# Altium PCB PCB_Z35_Wireless_board.PcbDoc
Units mm, origin at the board's own origin, x right, y up, seen from the top; angles counter-clockwise.
Board outline 67.94 x 65.02 mm, 2 copper layers (Top Layer, Bottom Layer), stack 1.671 mm thick; 92 components, 183 nets, 301 pads, 107 vias.
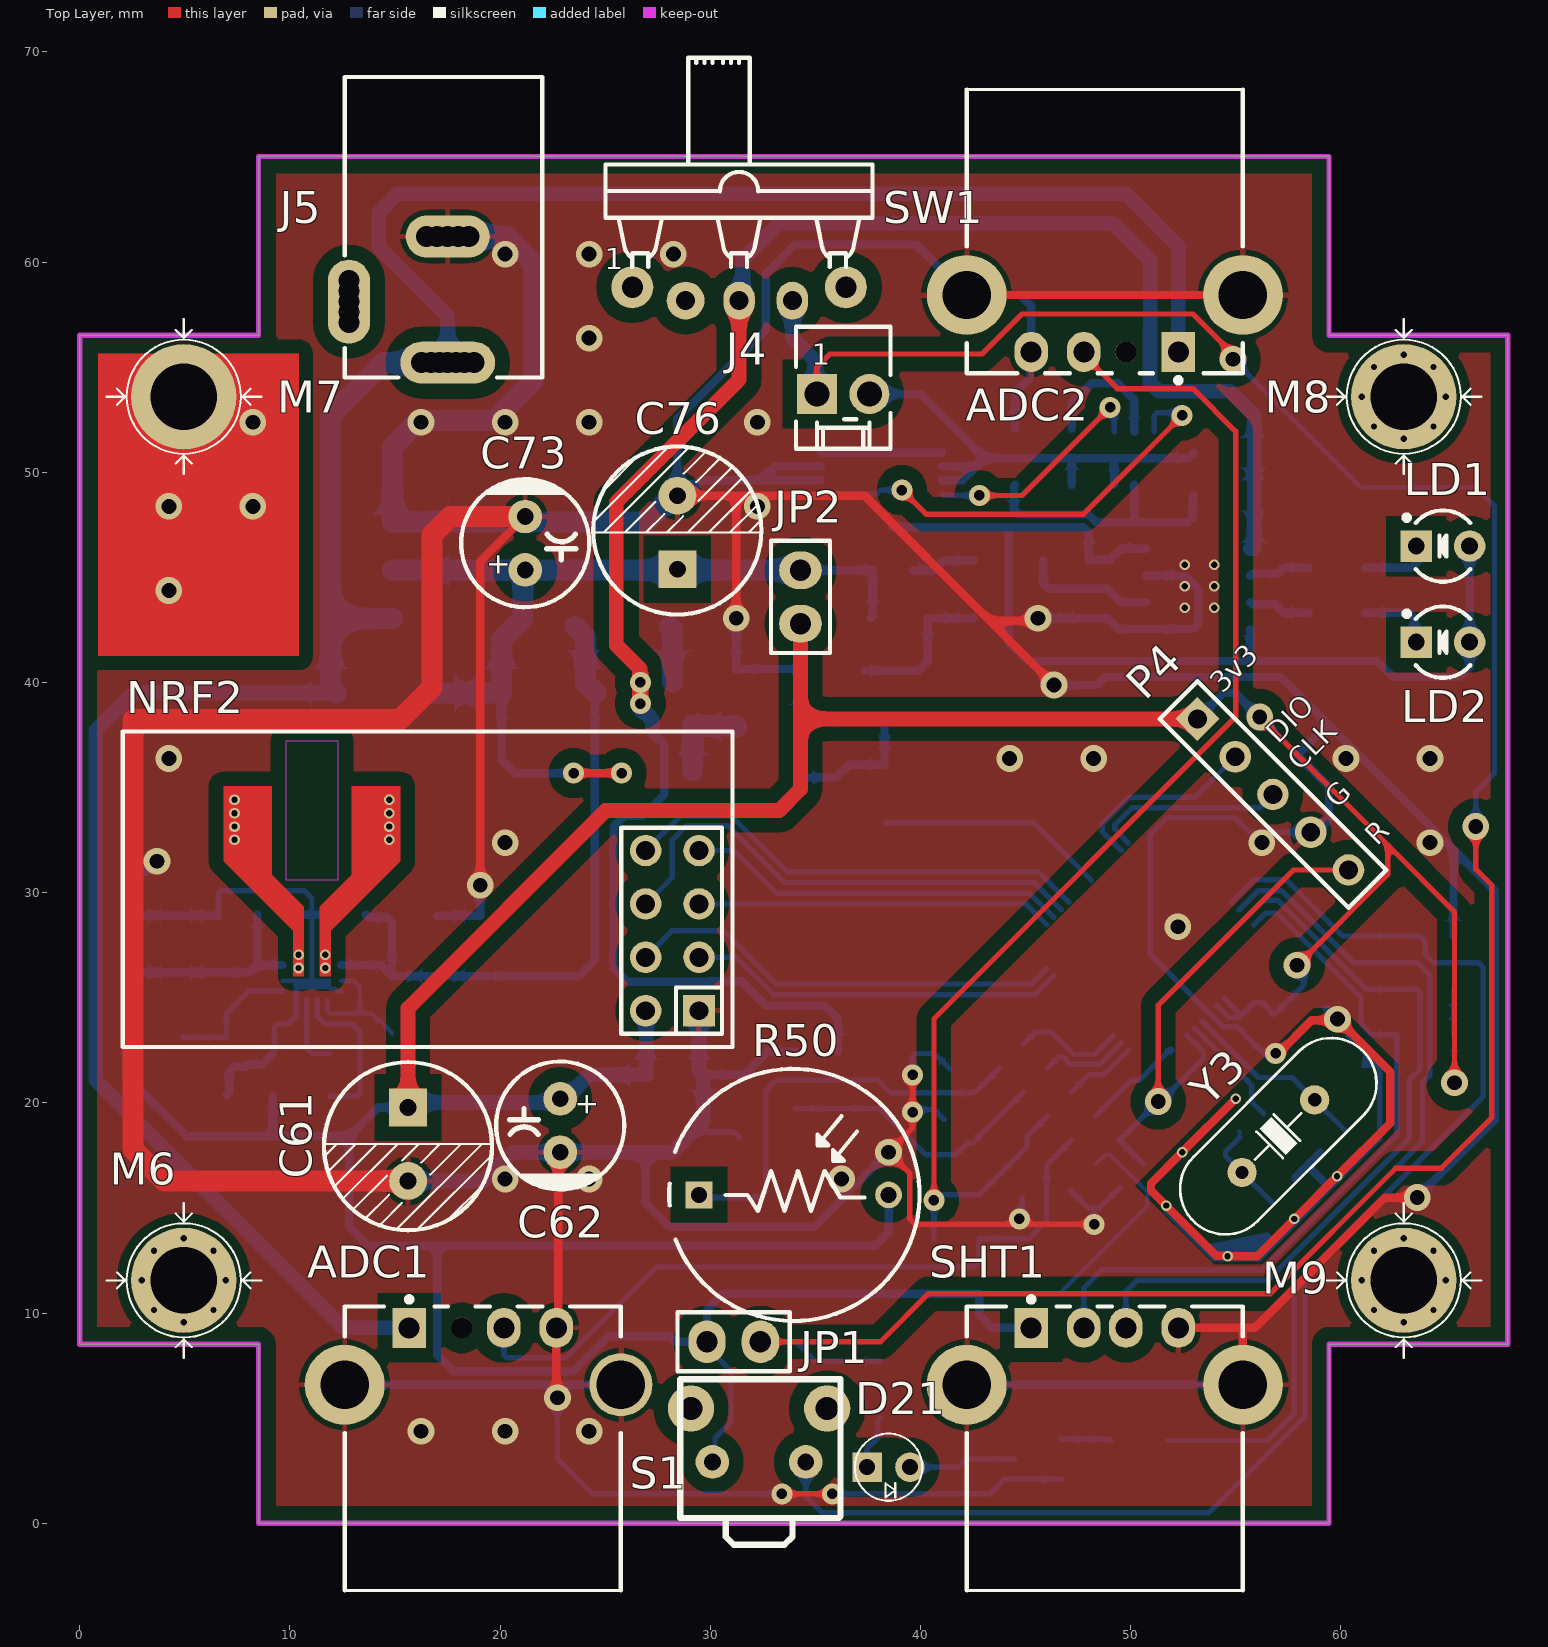
[diagram p0: Top Layer view]
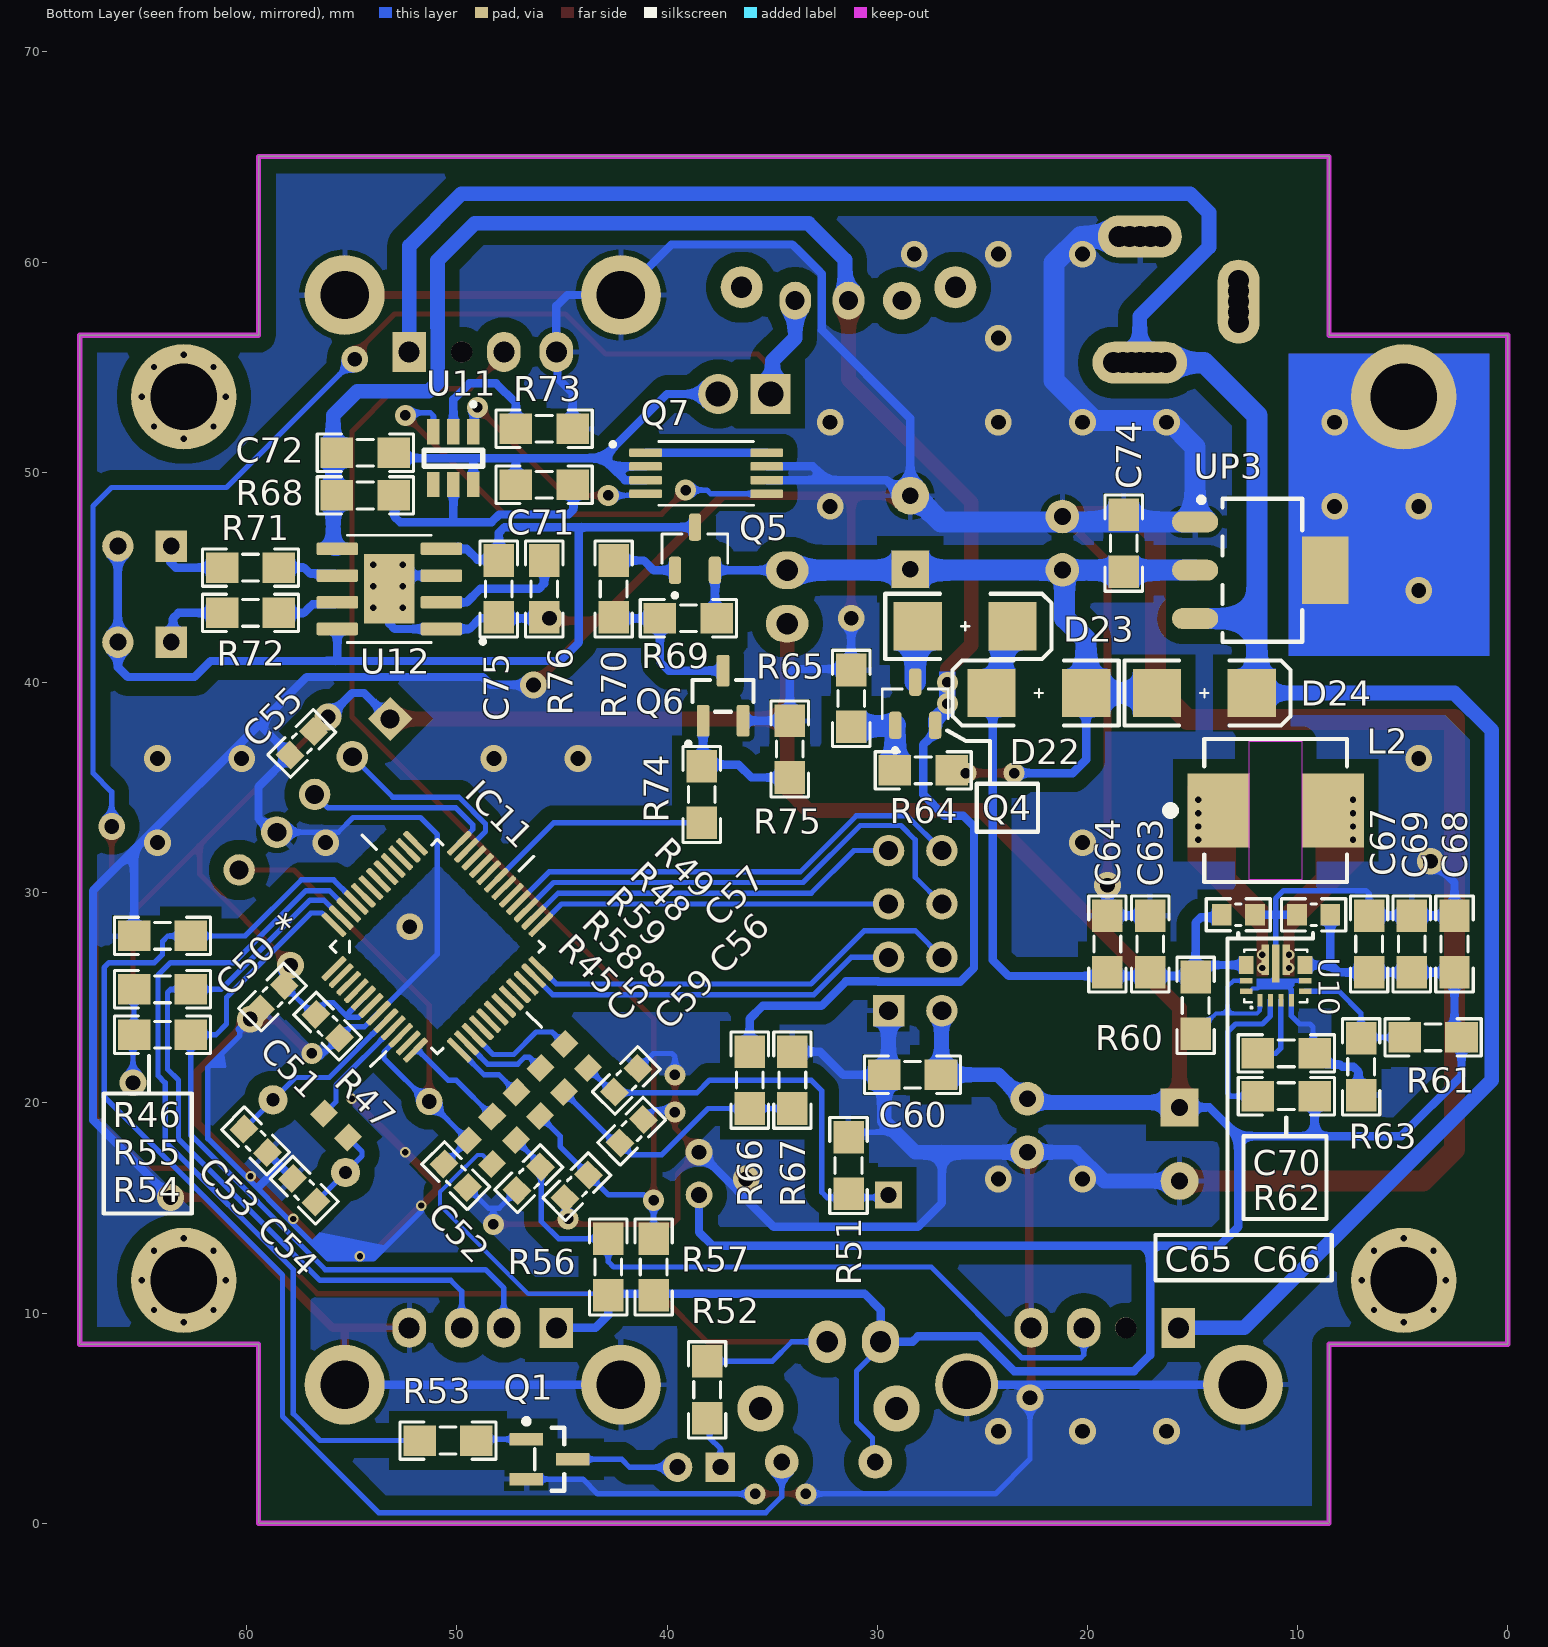
[diagram p1: Bottom Layer view, seen from below]
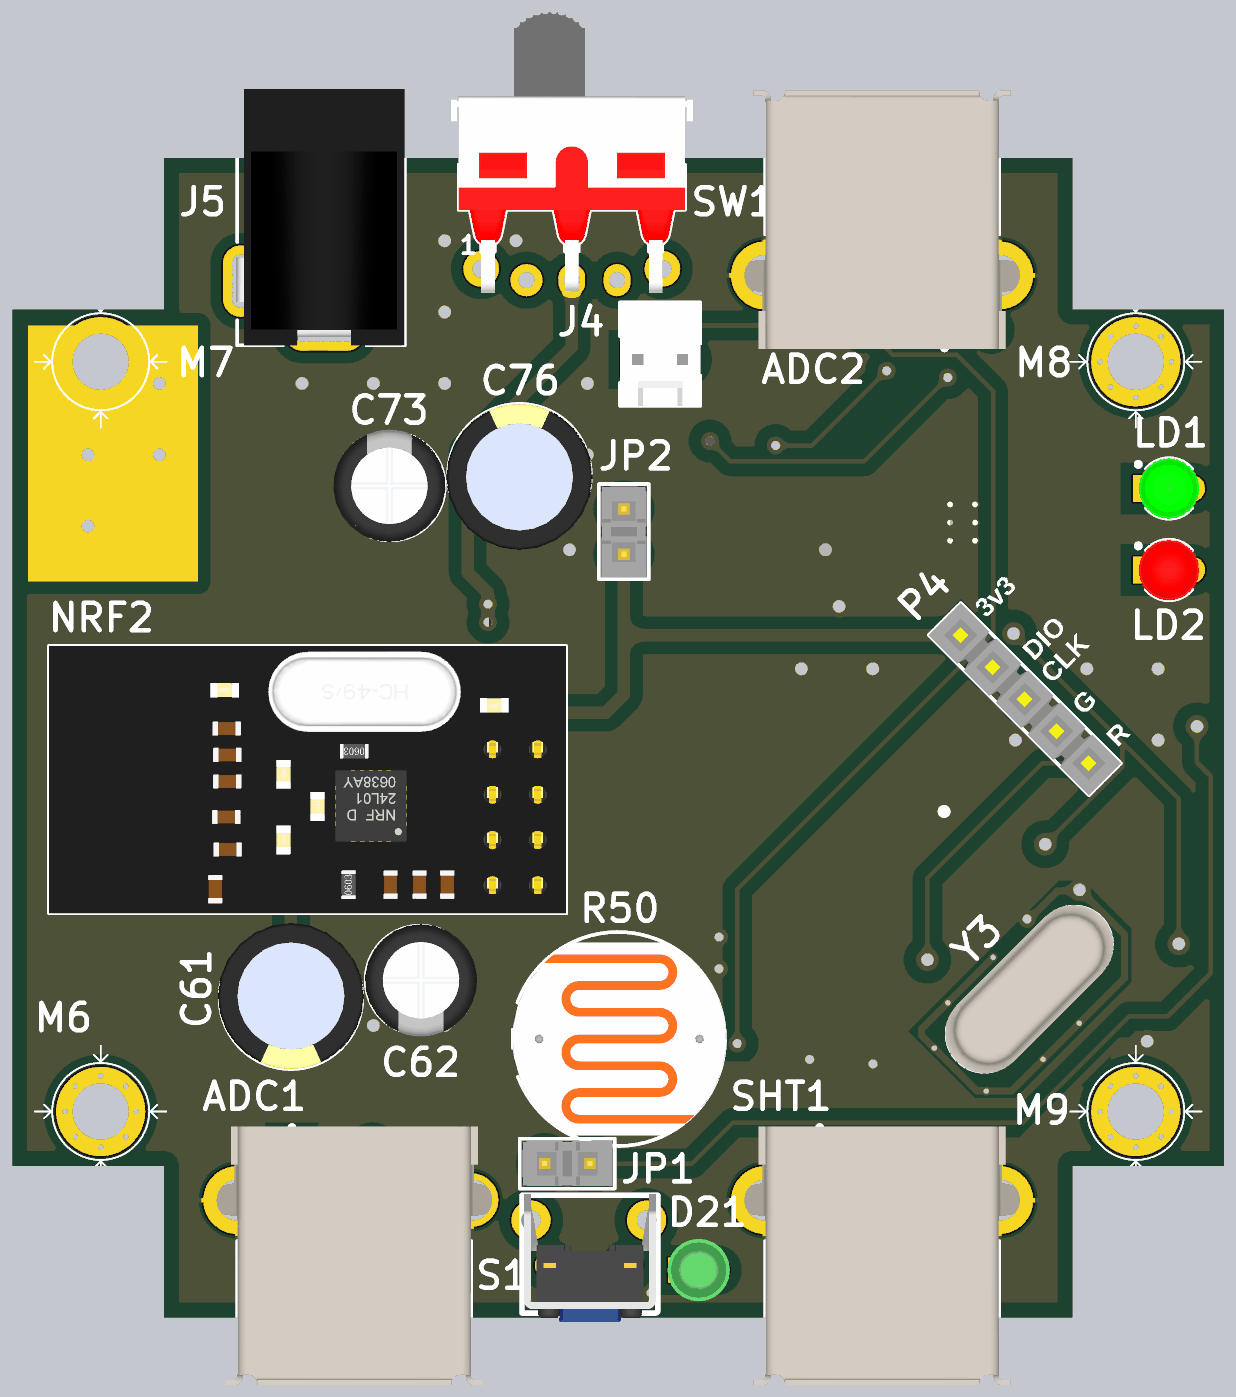
[diagram p2: 3D render of the assembled board from above, using the file's embedded part models]
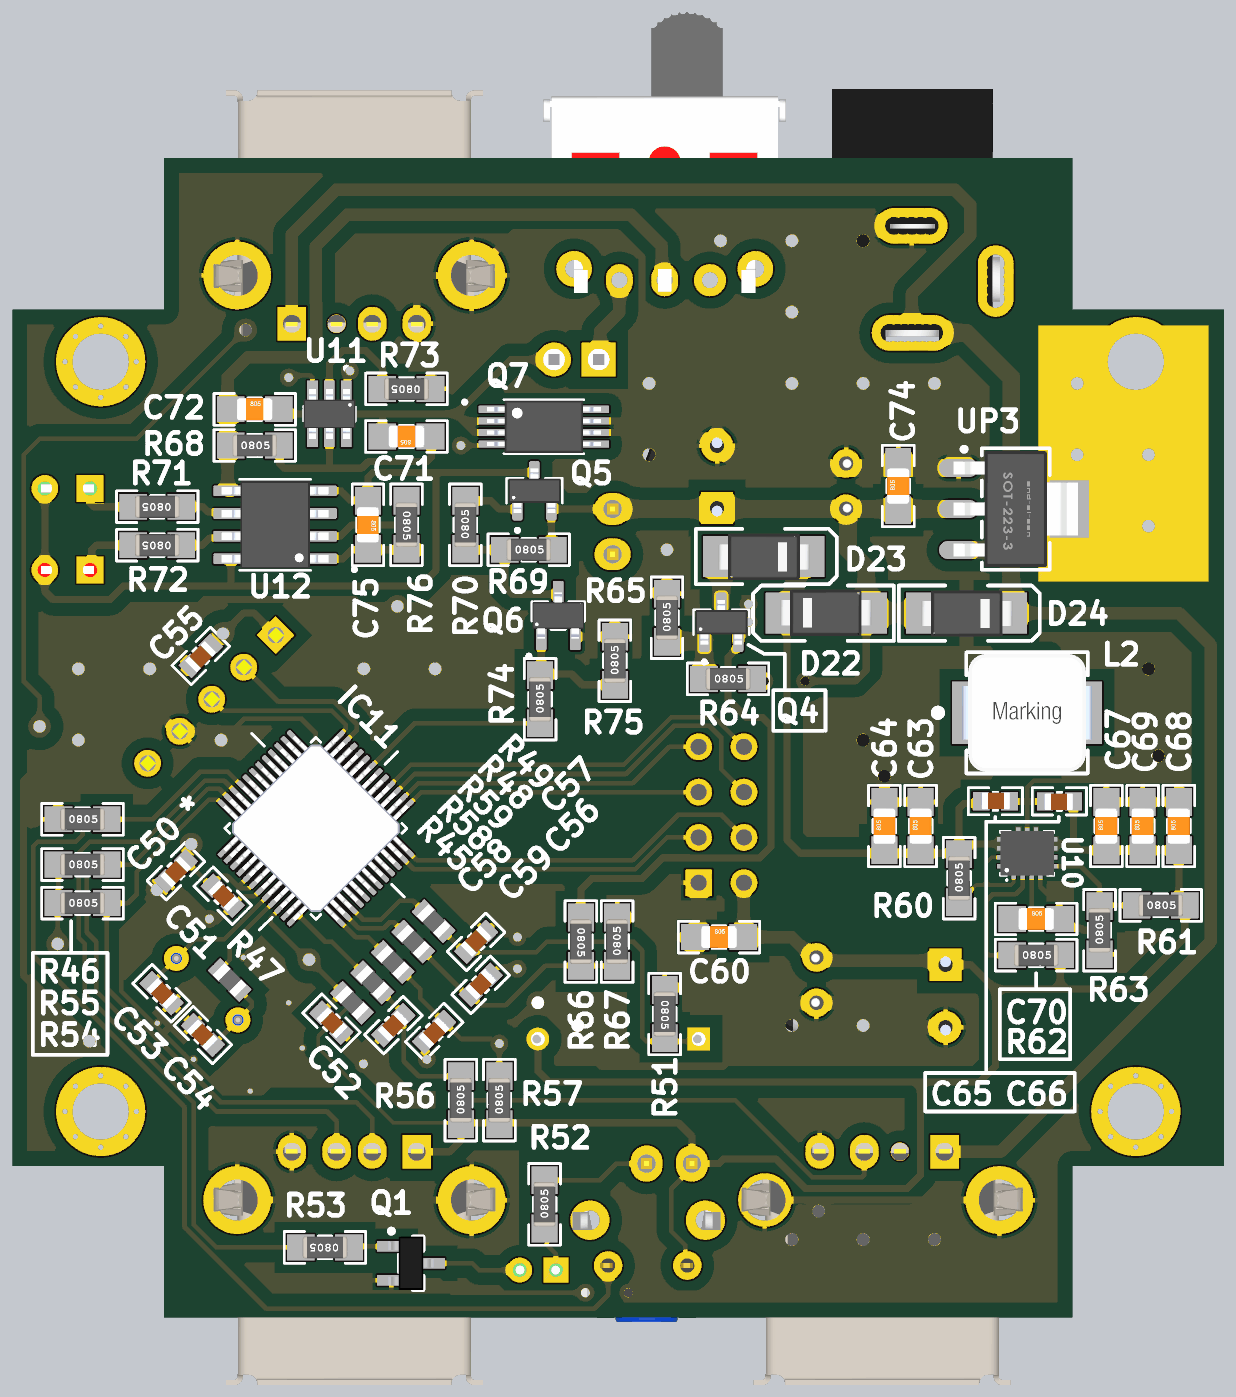
[diagram p3: 3D render of the assembled board from below, using the file's embedded part models]

## Layer stack, top to bottom
Top Solder: solder mask 0.0102, Solder Resist, Dk 3.5
Top Layer: signal copper 0.0356
Dielectric 1: dielectric 1.6, FR-4, Dk 4.8
Bottom Layer: signal copper 0.0356
Bottom Solder: solder mask 0.0102, Solder Resist, Dk 3.5

## Board outline
8.509,0 8.509,8.509 0,8.509 0,56.515 8.509,56.515 8.509,65.024 59.436,65.024 59.436,56.515 67.945,56.515 67.945,8.509 59.436,8.509 59.436,0

## Design rules (kind name [scope] priority, off if disabled: settings)
Clearance [All] p1: gap=0.15 ignorepadtopadclearanceinfootprint=FALSE except(0.7: Arc-Poly Track-Poly SMDPad-Poly THPad-Poly Via-Poly Fill-Poly Poly-Poly Poly-Region Poly-Text Poly-Hole)
ComponentClearance [All] p1: gap=0 collisioncheckmode=3 verticalgap=0 showdistances=FALSE
PlaneConnect [All] p1: pad.planeconnectstyle=Relief pad.reliefexpansion=0.508 pad.reliefentries=4 pad.reliefconductorwidth=0.254 pad.reliefairgap=0.254 via.planeconnectstyle=Direct via.reliefexpansion=0.508 via.reliefentries=4 via.reliefconductorwidth=0.254 via.reliefairgap=0
PolygonConnect [All] p1: thpad.connectstyle=Relief thpad.reliefconductorwidth=0.254 thpad.reliefentries=4 thpad.polygonreliefangle="90 Angle" thpad.airgapwidth=0.254 smdpad.connectstyle=Relief smdpad.reliefconductorwidth=0.254 smdpad.reliefentries=4 smdpad.polygonreliefangle="90 Angle" smdpad.airgapwidth=0.254 via.connectstyle=Direct via.reliefconductorwidth=0.254 via.reliefentries=4 via.polygonreliefangle="90 Angle" via.airgapwidth=0.254
RoutingVias [All] p1: holewidth=0.711 width=1.27 viastyle="Through Hole" minholewidth=0.3 minwidth=0.5 maxholewidth=0.711 maxwidth=1.27
SolderMaskExpansion [All] p1: expansion=0.102 istentingtop=FALSE
SupplyNets "Schematic Supply Nets_4" [InNet('GND')] p1: voltage=0.000
SupplyNets "Schematic Supply Nets_3" [InNet('3.3v')] p2: voltage=0.000
SupplyNets "Schematic Supply Nets_2" [InNet('+5')] p3: voltage=0.000
SupplyNets "Schematic Supply Nets_1" [InNet('GND-3.3v')] p4: voltage=0.000
SupplyNets "Schematic Supply Nets" [InNet('GND-12v')] p5: voltage=0.000
Width [All] p1: maxlimit=2 minlimit=0.2 preferedwidth=0.254
28 further rules are at their usual default settings.

## Components (designator, comment, footprint, x,y, rotation, side; value= is the part's Value field where it differs from the comment)
ADC1 "USB Connector" USB2.5-2H4C#1 19.177,3.81 r270 top
ADC2 "USB Connector" USB2.5-2H4C#2 48.768,61.214 r90 top
C50 "4.7uF" CAPC1608X90 58.801,25.019 r315 bottom
C51 "100nF" CAPC1608X90 56.134,23.622 r225 bottom
C52 "100nF" CAPC1608X90 50.038,16.51 r225 bottom
C53 "15pF" CAPC1608X90 59.563,18.161 r225 bottom
C54 "15pF" CAPC1608X90 57.277,15.875 r45 bottom
C55 "100nF" CAPC1608X90 57.404,37.084 r315 bottom
C56 "100nF" CAPC1608X90 41.656,18.669 r135 bottom
C57 "100nF" CAPC1608X90 41.91,21.082 r135 bottom
C58 "100nF" CAPC1608X90 46.609,16.383 r315 bottom
C59 "100nF" CAPC1608X90 44.323,16.002 r315 bottom
C60 "100nF" CAPC3413X12N 28.321,21.336 r180 bottom
C61 "1000uF" "Cap electrolitic radial 8x14-3.5" 15.621,18.034 r270 top value=1uF
C62 "10uF" "Cap electrolitic radial 6.3x12-2.5" 22.86,20.193 r270 top value=1uF
C63 "10uF" CAPC3413X12N 17.018,27.559 r90 bottom
C64 "10uF" CAPC3413X12N 19.05,27.559 r90 bottom
C65 "10uF" CAPC1608X90 12.796,28.938 r180 bottom
C66 "10uF" CAPC1608X90 9.271,28.956 r0 bottom
C67 "22uF" CAPC3413X12N 6.604,27.559 r90 bottom
C68 "22uF" CAPC3413X12N 2.54,27.559 r90 bottom
C69 "22uF" CAPC3413X12N 4.572,27.559 r90 bottom
C70 "10uF" CAPC3413X12N 10.541,22.352 r180 bottom
C71 "100nF" CAPC3413X12N 45.847,49.403 r0 bottom
C72 "10uF" CAPC3413X12N 54.356,50.927 r180 bottom
C73 "10uF" "Cap electrolitic radial 6.3x12-2.5" 21.195,45.355 r90 top value=1uF
C74 "100nF" CAPC3413X12N 18.274,46.625 r90 bottom
C75 "100nF" CAPC3413X12N 48.006,44.45 r270 bottom
C76 "1000uF" "Cap electrolitic radial 8x14-3.5" 28.434,47.133 r90 top value=1uF
D21 "LED3MM" LED3mm_GRN 38.481,2.667 r0 top
D22 "SS34" "DIODE SMD" 20.066,39.497 r0 bottom
D23 "SS34" "DIODE SMD" 28.067,42.672 r180 bottom
D24 "SMD 1N4007" "DIODE SMD" 16.692,39.497 r180 bottom
IC11 "STM32G030C8T6" QFP50P900X900X160-48N 50.927,27.432 r135 bottom
J4 "Battery" MOLEX_22-04-1021 36.322,53.721 r0 top
J5 "DC Power Jack" "DC Power Jack 1" 18.31,55.214 r270 top
JP1 "Jumper" "Jumper Small - 2.54 - GRAY" 31.115,8.636 r0 top
JP2 "Jumper" "Jumper Small - 2.54 - GRAY" 34.29,44.069 r270 top
L2 "1.5uH" WE-LHMI_7030 11.049,33.909 r180 bottom
LD1 "Green" LED_3MM_GREEN_1C-2A 64.854,46.49 r0 top
LD2 "Red" LED_3MM_RED_1C-2A 64.854,41.918 r0 top
M6 "Screw3mm" "Board Screw 3mm" 4.953,11.557 r0 top locked
M7 "Screw3mm" "Board Screw 3mm" 4.953,53.594 r0 top locked
M8 "Screw3mm" "Board Screw 3mm" 62.992,53.594 r0 top locked
M9 "Screw3mm" "Board Screw 3mm" 62.992,11.557 r0 top locked
NRF2 "NRF24L01+" NRF24L01P 29.464,24.384 r90 top
P4 "Prog" HDR1X5 53.177,38.263 r315 top
Q1 "BC337" SOT23_M 45.593,3.048 r180 bottom
Q4 "IRLML6402TRPBF" SOT95P237X112-3N 28.194,38.989 r90 bottom
Q5 "IRLML6402TRPBF" SOT95P237X112-3N 38.674,46.364 r90 bottom
Q6 "AO3400-5.8A" SOT95P260X140-3N 37.338,39.37 r90 bottom
Q7 "FS8205A" SOP65P640X120-8N 38.141,49.952 r180 bottom
R45 "10K" RESC1608X55N 48.895,17.653 r225 bottom value=100k
R46 "10K" RESC3413X04N 64.008,27.94 r180 bottom
R47 "1K2" RESC1608X55N 55.753,18.923 r45 bottom value=100k
R48 "1K" RESC1608X55N 45.466,21.082 r45 bottom value=100k
R49 "1K" RESC1608X55N 44.323,22.225 r45 bottom value=100k
R50 "02LDR1" LDR1_NTE 34.036,15.621 r0 top
R51 "10K" RESC3413X04N 31.369,17.018 r270 bottom
R52 "100R" RESC3413X04N 38.1,6.35 r90 bottom
R53 "1K" RESC3413X04N 50.419,3.937 r0 bottom
R54 "4K7" RESC3413X04N 64.008,23.241 r180 bottom
R55 "4K7" RESC3413X04N 64.008,25.4 r180 bottom
R56 "10K" RESC3413X04N 42.799,12.192 r90 bottom
R57 "10K" RESC3413X04N 40.64,12.192 r90 bottom
R58 "1K" RESC1608X55N 47.752,18.796 r45 bottom value=100k
R59 "1K" RESC1608X55N 46.609,19.939 r45 bottom value=100k
R60 "10K" RESC3413X04N 14.859,24.638 r90 bottom
R61 "470K" RESC3413X04N 3.556,23.114 r180 bottom
R62 "100K" RESC3413X04N 10.541,20.32 r180 bottom
R63 "150K" RESC3413X04N 6.985,21.717 r90 bottom
R64 "100R" RESC3413X04N 27.813,35.814 r180 bottom
R65 "10K" RESC3413X04N 31.242,39.243 r90 bottom
R66 "12K" RESC3413X04N 36.068,21.082 r270 bottom
R67 "33K" RESC3413X04N 34.036,21.082 r90 bottom
R68 "470R" RESC3413X04N 54.356,48.895 r180 bottom
R69 "10K" RESC3413X04N 38.989,43.053 r180 bottom
R70 "100R" RESC3413X04N 42.545,44.45 r90 bottom
R71 "1K" RESC3413X04N 59.817,45.466 r0 bottom
R72 "1K" RESC3413X04N 59.817,43.307 r0 bottom
R73 "1K" RESC3413X04N 45.847,52.07 r0 bottom
R74 "4K7" RESC3413X04N 38.354,34.671 r90 bottom
R75 "10K" RESC3413X04N 34.163,36.83 r90 bottom
R76 "1K5" RESC3413X04N 45.847,44.45 r270 bottom
S1 "switch" PCBComponent_1 36.322,6.985 r180 top
SHT1 "USB Connector" USB2.5-2H4C#3 48.768,3.81 r270 top
SW1 "SS-12F23" SW_C&K_110xM2S3AxE2 31.369,58.166 r270 top
U10 "TPS63070RNMT" QFN50P250X300X100-15N 11.049,26.035 r90 bottom
U11 "DW01A" SOT95P280X145-6N 50.165,50.673 r270 bottom
U12 "TP4056" SOP127P600X175-9N 53.213,44.45 r0 bottom
UP3 "5v - 3.3v" SOT223 11.684,45.339 r180 bottom
Y3 "8MHz" "CRYSTAL Small" 57.023,18.415 r225 top value="12 MHz"

## Footprints (in the part's own frame and the unit in brackets; to place one, negate y for a bottom-side part, rotate by r counter-clockwise, add the part's x,y. Pads: shape width x height; smd on the part's side, far side on the other; paste and mask are expansions set on the pad)
"Board Screw 3mm" [mm]
  round 5 hole 3.15 mask+0.1: S(0,0)
  silkscreen extent -3.68,-3.68 3.68,3.68
"Cap electrolitic radial 6.3x12-2.5" [mm] "Capacitor Electrolytic D=6.3 x H=12 - P=2.5 mm, Altium Compatible"
  round 1.6 hole 0.8: 1(0,0) 2(2.54,0)
  silkscreen extent -1.78,-3.04 4.32,3.05, body extent -1.87,-3.09 4.43,3.2, height 1.2
"Cap electrolitic radial 8x14-3.5" [mm] "Cap electrolitic radial 8x14-3.5-Design:Abbas Basereh"
  rect 1.8x1.8 hole 0.8: 1(-1.75,0)
  round 1.8 hole 0.8: 2(1.75,0)
  silkscreen extent -3.9,-4 4.1,4, body extent -4.1,-4.1 4.1,4.1, height 14.6
CAPC1608X90 [mm]
  rect 0.94x1.02 smd: 1(-0.821,0.01) 2(0.759,0.01)
  silkscreen extent -1.56,-0.75 1.49,0.77, body extent -0.8,-0.44 0.8,0.51, height 0.8
CAPC3413X12N [mm] "Chip Capacitor, 2-Leads, Body 3/40x1/30mm, IPC Medium Density-Design:Abbas Basereh"
  rect 1.55x1.45 smd: 1(-1.35,0) 2(1.35,0)
  silkscreen extent -2.29,-0.89 2.29,0.89, body extent -1,-0.63 1,0.62, height 0.78
"CRYSTAL Small" [mil] "DESIGNER ABBAS BASEREH"
  round 55 hole 25: 1(-96.06,0) 2(96.06,0)
  silkscreen extent -225,-85 225,85, body extent -226,-89 226,89, height 142
"DC Power Jack 1" [mm] "Power Adaptor Jack"
  round 1.5 hole 1: 1(0,0.45) 1(0,0) 1(0,-0.4) 1(0,-1.2) 1(0,-1.6) 1(0,-2.05) 2(-6,-1.8) 2(-6,0.2) 2(-6,-1.3) 2(-6,-0.3) 3(-3.9,-5.5) 3(-3.4,-5.5) 3(-2.4,-5.5) 3(-1.9,-5.5)
  oval 2x4.5 hole 1: 1(0,-0.8)
  oval 2x4 hole 1: 2(-6,-0.8)
  oval 4x2 hole 1: 3(-2.9,-5.5)
  silkscreen extent -13.59,-5.7 0.7,3.7, body extent -13.68,-5.74 0.72,3.66, height 11.05
"DIODE SMD" [mm]
  rect 2.3x2.3 smd: 1(0,0) 2(4.5,0)
  silkscreen extent -1.55,-1.55 6.35,1.55, body extent -0.28,-1.32 4.82,1.28, height 2.31
HDR1X5 [mm] "Connector; Header; 5 Position"
  rect 1.5x1.5 hole 0.9: 1(0,0)
  round 1.5 hole 0.9: 2(2.54,0) 3(5.08,0) 4(7.62,0) 5(10.16,0)
  silkscreen extent -1.27,-1.27 11.43,1.27, body extent -1.28,-1.27 11.42,1.27, height 8.38
"Jumper Small - 2.54 - GRAY" [mil]
  oval 70x80 hole 40: 1(-50,0) 2(50,0)
  silkscreen extent -105,-55 105,55, body extent -100,-50 100,50, height 337
LDR1_NTE [mil]
  rect 50x50 hole 30 paste-99999 mask+0: 1(-180,0)
  round 50 hole 30 paste-99999 mask+0: 2(175,0)
  silkscreen extent -236,-236 233,236, body extent -236,-213 236,213, height 394
LED3mm_GRN [mil]
  rect 55x55 hole 30: 1(-40,0)
  round 55 hole 30: 2(40,0)
  silkscreen extent -63,-63 63,63, body extent -69,-69 69,69, height 154
LED_3MM_GREEN_1C-2A [mm] "LED, Green, Body Dia. 3.43 mm, Pin spacing 2.54mm"
  rect 1.5x1.5 hole 0.8: 1(-1.27,0)
  round 1.5 hole 0.8: 2(1.27,0)
  silkscreen extent -1.85,-1.7 1.3,1.7, body extent -1.71,-1.71 1.72,1.72, height 9.85
LED_3MM_RED_1C-2A [mm] "LED, Red, Body Dia. 3.43 mm, Pin spacing 2.54mm"
  rect 1.5x1.5 hole 0.8: 1(-1.27,0)
  round 1.5 hole 0.8: 2(1.27,0)
  silkscreen extent -1.85,-1.7 1.3,1.7, body extent -1.71,-1.71 1.72,1.72, height 9.85
MOLEX_22-04-1021 [mm] "2.5mm (.100\") Pitch KK® Header, Single Row, Vertical, 2 Circuits"
  rect 1.9x1.9 hole 1.2: 1(-1.25,0)
  round 1.9 hole 1.2: 2(1.25,0)
  silkscreen extent -2.25,-2.6 2.25,3.2, body extent -2.25,-2.6 2.25,3.2, height 11.7
NRF24L01P [mm] "NRFL01+ Module"
  rect 1.5x1.5 hole 0.9: 1(0,0)
  round 1.5 hole 0.9: 2(0,2.54) 3(2.54,0) 4(2.54,2.54) 5(5.08,0) 6(5.08,2.54) 7(7.62,0) 8(7.62,2.54)
  silkscreen extent -1.72,-1.59 13.28,27.41, body extent -1.72,-1.59 13.28,27.41, height 15.5
PCBComponent_1 [mm]
  round 1.6 hole 0.8: 1(1.778,4.064) 2(6.223,4.064)
  round 2.2 hole 1.1: 3(7.239,1.524) 4(0.762,1.524)
  silkscreen extent 0.13,0.13 7.75,8, body extent -0.22,0.06 8.09,7.21, height 7.1
QFN50P250X300X100-15N [mm]
  rect 0.6x0.25 smd mask+0: 1(-1.15,0.75) 2(-1.15,0.25) 3(-1.15,-0.25) 4(-1.15,-0.75)
  rect 0.25x0.6 smd mask+0: 5(-0.725,-1.4) 6(-0.225,-1.4) 14(-0.225,1.4) 15(-0.725,1.4)
  rect 0.85x0.7 smd paste-1 mask+0: 7-8(0.525,-1.4) 12-13(0.525,1.4)
  rect 1.45x0.35 smd paste-2 mask+0: 9(0.775,-0.5)
  rect 1.8x0.35 smd paste-2 mask+0: 10(0.6,0)
  rect 1.45x0.35 smd paste-2 mask+0.102: 11(0.775,0.5)
  silkscreen extent -1.55,-1.5 1.25,1.5, body extent -1.25,-1.5 1.25,1.5, height 1
QFP50P900X900X160-48N [mil]
  rrect50% 58x11 smd: 1(-166,108) 2(-166,89) 3(-166,69) 4(-166,49) 5(-166,30) 6(-166,10) 7(-166,-10) 8(-166,-30) 9(-166,-49) 10(-166,-69) 11(-166,-89) 12(-166,-108) 25(166,-108) 26(166,-89) 27(166,-69) 28(166,-49) 29(166,-30) 30(166,-10) 31(166,10) 32(166,30) 33(166,49) 34(166,69) 35(166,89) 36(166,108)
  rrect50% 11x58 smd: 13(-108,-166) 14(-89,-166) 15(-69,-166) 16(-49,-166) 17(-30,-166) 18(-10,-166) 19(10,-166) 20(30,-166) 21(49,-166) 22(69,-166) 23(89,-166) 24(108,-166) 37(108,166) 38(89,166) 39(69,166) 40(49,166) 41(30,166) 42(10,166) 43(-10,166) 44(-30,166) 45(-49,166) 46(-69,166) 47(-89,166) 48(-108,166)
  silkscreen extent -247,-245 247,248, body extent -177,-177 177,177, height 60
RESC1608X55N [mm] "Chip Resistor, EIA 0603, Metric 1608, Body 1.6x0.8mm, IPC Medium Density"
  rect 0.9x1 smd: 1(-0.8,0) 2(0.8,0)
  body extent -0.87,-0.47 0.88,0.48, height 0.55
RESC3413X04N [mm] "Chip Resistor, 2-Leads, Body 3/40x1/30mm, IPC Medium Density-Design:Abbas Basereh"
  rect 1.55x1.45 smd: 1(-1.35,0) 2(1.35,0)
  silkscreen extent -2.29,-0.89 2.29,0.89, body extent -1.25,-0.62 1.25,0.62, height 0.79
SOP65P640X120-8N [mm]
  rrect25% 1.56x0.4 smd: 1(-2.88,0.975) 2(-2.88,0.325) 3(-2.88,-0.325) 4(-2.88,-0.975) 5(2.88,-0.975) 6(2.88,-0.325) 7(2.88,0.325) 8(2.88,0.975)
  silkscreen extent -4.54,-1.52 2.25,1.52, body extent -3.2,-1.47 3.2,1.47, height 1.2
SOP127P600X175-9N [mm]
  rrect25% 1.97x0.6 smd: 1(-2.475,1.905) 2(-2.475,0.635) 3(-2.475,-0.635) 4(-2.475,-1.905) 5(2.475,-1.905) 6(2.475,-0.635) 7(2.475,0.635) 8(2.475,1.905)
  rect 2.413x3.302 smd paste-3: 9(0,0)
  silkscreen extent -4.54,-2.55 2,2.6, body extent -3,-2.45 3,2.45, height 1.75
SOT23_M [mm] "SOT23, 3-Leads, Body 2.9x1.3mm, Pitch 0.95mm, Lead Span 2.3mm, IPC Low Density"
  rect 1.6x0.6 smd: 1(-1.1,0.95) 2(-1.1,-0.95) 3(1.1,0)
  silkscreen extent -1.23,-1.5 0.7,1.92, body extent -1.27,-1.5 1.27,1.5, height 1.1
SOT95P237X112-3N [mm]
  rrect50% 1.3x0.59 smd: 1(-1.025,0.95) 2(-1.025,-0.95) 3(1.025,0)
  silkscreen extent -2.32,-1.57 0.7,1.57, body extent -1.25,-1.46 1.25,1.46, height 1.12
SOT95P260X140-3N [mm]
  rrect25% 1.5x0.6 smd: 1(-1.19,0.95) 2(-1.19,-0.95) 3(1.19,0)
  silkscreen extent -2.39,-1.45 0.75,1.75, body extent -1.3,-1.45 1.3,1.45, height 1.4
SOT95P280X145-6N [mm]
  rect 1.21x0.59 smd: 1(-1.255,0.95) 2(-1.255,0) 3(-1.255,-0.95) 4(1.255,-0.95) 5(1.255,0) 6(1.255,0.95)
  silkscreen extent -2.65,-1.4 0.38,1.4, body extent -1.4,-1.45 1.4,1.45, height 1.45
SOT223 [mm] "SOT223, 4-Leads, Body 6.5x3.5mm, Pitch 2.30mm-Designer Abbas Basereh"
  oval 2.2x1 smd: 1(-3.2,2.3) 2(-3.2,0) 3(-3.2,-2.3)
  rect 2.2x3.2 smd: 4(3,0)
  Top Layer pour cut-out: -1.7,3.556 1.7,3.556 1.7,-3.556 -1.7,-3.556
  silkscreen extent -3.03,-3.4 1.9,3.47, body extent -3.5,-3.25 3.5,3.25, height 1.7
SW_C&K_110xM2S3AxE2 [mm] "Right Angled PC Thru-Hole SPDT Slide Switch, .200\" High Actuator, C&K 1000 Series"
  round 1.8 hole 0.9: 1(0,-2.54)
  oval 1.8x1.5 hole 0.9: 2(0,0) 3(0,2.54)
  round 2 hole 1: 4(-0.635,5.08) 4(-0.635,-5.08)
  silkscreen extent -6.48,-6.35 -1.61,6.35, body extent -15.06,-6.78 0.71,6.78, height 6.6
USB2.5-2H4C#1 [mm] "Connector; USB1.1, Type A, Thru-Hole; 4 Position; Right Angle DESIGNER ABBAS BASEREH"
  rect 1.9x1.6 hole 1: 1(-5.49,-3.5)
  round 1 hole 1: 2(-5.49,-1)
  oval 1.9x1.6 hole 1: 3(-5.49,1) 4(-5.49,3.5)
  round 3 hole 2.3: 4(-2.78,6.57)
  round 3.8 hole 2.3: 4(-2.78,-6.57)
  silkscreen extent -6.96,-6.57 7,6.57, body extent -6.9,-7.9 7.6,7.9, height 7.35
USB2.5-2H4C#2 [mm] "Connector; USB1.1, Type A, Thru-Hole; 4 Position; Right Angle DESIGNER ABBAS BASEREH"
  rect 1.9x1.6 hole 1: 1(-5.49,-3.5)
  round 1 hole 1: 2(-5.49,-1)
  oval 1.9x1.6 hole 1: 3(-5.49,1) 4(-5.49,3.5)
  round 3.8 hole 2.3: 4(-2.78,6.57) 4(-2.78,-6.57)
  silkscreen extent -6.96,-6.57 7,6.57, body extent -6.9,-7.9 7.6,7.9, height 7.35
USB2.5-2H4C#3 [mm] "Connector; USB1.1, Type A, Thru-Hole; 4 Position; Right Angle DESIGNER ABBAS BASEREH"
  rect 1.9x1.6 hole 1: 1(-5.49,-3.5)
  oval 1.9x1.6 hole 1: 2(-5.49,-1) 3(-5.49,1) 4(-5.49,3.5)
  round 3.8 hole 2.3: 4(-2.78,6.57) 4(-2.78,-6.57)
  silkscreen extent -6.96,-6.57 7,6.57, body extent -6.9,-7.9 7.6,7.9, height 7.35
WE-LHMI_7030 [mm]
  rect 2.95x3.5 smd paste+0 mask+0.102: 1(-2.725,0) 2(2.725,0)
  Keep-Out Layer region: 1.25,-3.3 -1.25,-3.3 -1.25,3.3 1.25,3.3
  silkscreen extent -5.2,-3.4 3.4,3.4, body extent -3.65,-3.3 3.65,3.3, height 2.7

## Part data
ADC1 ADC2 SHT1: library part "USB A-Type", "USB Connector-A Type"
C50 C51 C52 C53 C54 C55 C56 C57 C58 C59 C65 C66: library part "Cap 0603", "0603 C 100nF Ceramic Multilayer Capacitor, 25 V, +125degC, X7R Dielectric, +/-5%", Package="603-2 KEMET", Check_prices=https://www.snapeda.com/parts/C0603C104J3RACTU/KEMET/view-part/?ref=eda, MF=KEMET, MP=C0603C104J3RACTU, SnapEDA_Link=https://www.snapeda.com/parts/C0603C104J3RACTU/KEMET/view-part/?ref=snap
C60 C63 C64 C67 C68 C69 C70 C71 C72 C74 C75: library part "CAP SMD 0805", "CAP 0805", Data=16-12-2016, Desc.="CAP SMD 0805", Designer="Abbas Basereh"
C61 C62 C73 C76: library part "Cap ELECTROLITIC TOTAL SIZE", "Cap electrolitic radial", Data=16-12-2016, Designer="Abbas Basereh"
D21: library part "LED 3MM", "Light Emitting Diode", Designer="Ali Hafizi"
D22 D23 D24: library part "Diode SMD Package", "Diode SMD Pakage"
IC11: "ARMÂ® CortexÂ®-M0+ series Microcontroller IC 32-Bit Single-Core 64MHz 64KB (64K x 8) FLASH 48-LQFP (7x7)", Package="LQFP-48 STMicroelectronics", Availability="In Stock", Check_prices=https://www.snapeda.com/parts/STM32G030C8T6/STMicroelectronics/view-part/?ref=eda, MF=STMicroelectronics, MP=STM32G030C8T6, PRICE=None, Purchase-URL=https://pricing.snapeda.com/search/part/STM32G030C8T6/?ref=eda, SnapEDA_Link=https://www.snapeda.com/parts/STM32G030C8T6/STMicroelectronics/view-part/?ref=snap
J4: library part MOLEX_22-04-1021, "Connector 2 Male", Manufacturer=MOLEX, Manufacturer Part Number=22-04-1021, Author="CERN DEM JLC", Component Type=Standard, ComponentHeight=11.7mm, CreateDate=2/9/2012, Family=KK®, HelpURL=\\cern.ch\dfs\Applications\Altium\Datasheets\MOLEX_22-04-1021.pdf, LatestRevisionDate=2/9/2012, Mounted=Yes, Part Description="2.5mm (.100\") Pitch KK® Wire-to-Board Header, Vertical, with Friction Lock, 2 Circuits, Tin (Sn) Plating", Part Number=MOLEX_22-04-1021, Pin Count=2, PressFit=No, Sense=No, SMD=No, Socket=No, Status=Obsolete
J5: "DC Power Jack. Center Pin 2.5mm. Diameter: 5.7mm", Adding Date=10/21/2009, Company=Personal, Designer="Ali Hafizi", Project Name=Laser
L2: library part TMPC0603H-1R5MG-D, "SMD Power Choke Coil 1.5uH 18A 7.3x6.6mm", Package=None, Availability=Unavailable, MP=altium_native_batch, PRICE=None
LD1: library part LED_AVAGO_HLMP-1790, "LED Green 1C 2A", Manufacturer="AVAGO TECHNOLOGIES", Manufacturer Part Number=HLMP-1790, Author="CERN DEM JLC", Bonding=No, Color=Green, Component Type=Standard, ComponentHeight=6.35mm(min), CreateDate=6/12/2008, HelpURL=\\cern.ch\dfs\Applications\Altium\Datasheets\LED_AVAGO_HLMP-1790.pdf, LatestRevisionDate=3/17/2010, Mounted=Yes, PackageDescription="LED, Green, Body Dia. 3.43 mm, Pin spacing 2.54mm", Part Description="3mm Green LED", Part Number=LED_AVAGO_HLMP-1790, Pin Count=2, PressFit=No, Sense=No, SMD=No, Socket=No
LD2: library part LED_AVAGO_HLMP-1700, "LED Red 1C 2A", Manufacturer="AVAGO TECHNOLOGIES", Manufacturer Part Number=HLMP-1700, Author="CERN DEM JLC", Bonding=No, Color=Red, Component Type=Standard, ComponentHeight=6.35mm(min), CreateDate=6/12/2008, HelpURL=\\cern.ch\dfs\Applications\Altium\Datasheets\LED_AVAGO_HLMP-1700.pdf, LatestRevisionDate=3/17/2010, Mounted=Yes, PackageDescription="LED, Red, Body Dia. 3.43 mm, Pin spacing 2.54mm", Part Description="3mm Red LED", Part Number=LED_AVAGO_HLMP-1700, Pin Count=2, PressFit=No, Sense=No, SMD=No, Socket=No
M6 M7 M8 M9: library part "Board Screw 3mm", "Board Screw With Spacer 3mm", Data=16-12-2016, Designer="Abbas Basereh"
NRF2: library part NRF24L01P, "RF Module", Ali Hafizi=Creature
P4: library part "Header 5", "Header, 5-Pin", LatestRevisionDate=17-Jul-2002, LatestRevisionNote="Re-released for DXP Platform.", Publisher="Altium Limited"
Q1: "45 V, 500 mA NPN general-purpose transistors", ComponentLink1Description="Manufacturer Link", ComponentLink1URL=http://www.nxp.com/, ComponentLink2Description=Datasheet, ComponentLink2URL=http://www.nxp.com/, DatasheetVersion=2017, LatestRevisionDate=2017, LatestRevisionNote="IPC-7351 Footprint Added.", PackageDescription="3-Pin SOT-23 Package 0.95 mm Pitch, 2.3 mm Lead Span", PackageReference=SOT23, PackageVersion=2017-2-8, Published=2017-2-8, Publisher="Abbas Basereh"
Q4 Q5: "P-Channel 20 V 3.7A (Ta) 1.3W (Ta) Surface Mount Micro3Ã¢â€žÂ¢ /SOT-23", Package="SOT-23-3 ON Semiconductor", Check_prices=https://www.snapeda.com/parts/IRLML6402TRPBF/Infineon/view-part/?ref=eda, MF=Infineon, MP=IRLML6402TRPBF, SnapEDA_Link=https://www.snapeda.com/parts/IRLML6402TRPBF/Infineon/view-part/?ref=snap
Q6: "N-Channel 30 V 5.8A (Ta) 1.5W (Ta) Surface Mount SOT-23", Package=None, Availability="In Stock", Check_prices=https://www.snapeda.com/parts/AO3400-5.8A/MDD/view-part/?ref=eda, MF=MDD, MP=AO3400-5.8A, PRICE=None, Purchase-URL=https://pricing.snapeda.com/search/part/AO3400-5.8A/?ref=eda, SnapEDA_Link=https://www.snapeda.com/parts/AO3400-5.8A/MDD/view-part/?ref=snap
Q7: "Dual N-Channel Enhancement Mode Power MOSFET", Package=Package, Check_prices=https://www.snapeda.com/parts/FS8205A/Fortune+Semiconductor/view-part/?ref=eda, MF="Fortune Semiconductor", MP=FS8205A, SnapEDA_Link=https://www.snapeda.com/parts/FS8205A/Fortune+Semiconductor/view-part/?ref=snap
R45 R47 R48 R49 R58 R59: library part R0603_100K_0.1%_0.063W_10PPM, "Resistor - 0.1%", Case=0603, Manufacturer=GENERIC, Manufacturer1 ComponentHeight=0.55mm, Manufacturer1 Example="TYCO HOLSWORTHY", Manufacturer1 Part Number=RN73C1J100KBTDF, Power=0.063W, Tolerance=±0.1%, Author="CERN DEM JLC", Component Type=Standard, CreateDate=12/3/2007, HelpURL=\\cern.ch\dfs\Applications\Altium\Datasheets\R0603_Tyco_RN73.pdf, LatestRevisionDate=3/13/2008, Manufacturer Part Number=R0603_100K_0.1%_0.063W_10PPM, Mounted=Yes, Part Description="Thin Film Chip Resistor", Part Number=R0603_100K_0.1%_0.063W_10PPM, Pin Count=2, PressFit=No, Sense=No, SMD=Yes, Socket=No, Status="Not Recommended", TC=±10ppm
R46 R51 R52 R53 R54 R55 R56 R57 R60 R61 R62 R63 R64 R65 R66 R67 R68 R69 R70 R71 R72 R73 R74 R75 R76: library part "RES 0805 0.125W", "RES 0805", Data=16-12-2016, Desc.="RES SMD 0805", Designer="Abbas Basereh"
R50: library part "LDR 12mm", "12mm LDR / PIN to PIN is 9mm", Manufacturer_Name="NTE Electronics", Copyright="Copyright (C) 2025 Ultra Librarian. All rights reserved.", Manufacturer_Part_Number=02LDR1, RefDes=RefDes, Type=Type
S1: library part stand_key
SW1: library part SW_C&K_1103M2S3AQE2, "SPDT Switch", Manufacturer=C&K, Manufacturer Part Number=1103M2S3AQE2, Author="CERN DEM BC", Component Type=Standard, ComponentHeight=6.6mm, CreateDate=7/1/2019, Family=Switch, HelpURL=\\cern.ch\dfs\Applications\Altium\Datasheets\SW_C&K_1103M2S3AQE2.pdf, LatestRevisionDate=7/1/2019, Mounted=Yes, PackageDescription="Right Angle, PC Thru-Hole SPDT Slide Switch, .200\" High Actuator, C&K 1000 Series", Part Description="Right Angled PC Thru-Hole SPDT Slide Switch, .200\" High Actuator, C&K 1000 Series", Part Number=SW_C&K_1103M2S3AQE2, Pin Count=5, PressFit=No, Sense=Yes, Sense Comment=Non-washable, SMD=No, Socket=No, Status=None
U10: "TPS63070 2-V to 16-V Buck-Boost Converter With 3.6-A Switch Current", Package="VQFN-HR-15 Texas Instruments", Check_prices=https://www.snapeda.com/parts/TPS63070RNMT/Texas+Instruments/view-part/?ref=eda, MF="Texas Instruments", MP=TPS63070RNMT, SnapEDA_Link=https://www.snapeda.com/parts/TPS63070RNMT/Texas+Instruments/view-part/?ref=snap
U11: "One Cell Lithium-ion/Polymer Battery Protection IC", Package="SOT-23-6 Fortune Semiconductor", Check_prices=https://www.snapeda.com/parts/DW01A/Fortune+Semiconductor/view-part/?ref=eda, MF="Fortune Semiconductor", MP=DW01A, SnapEDA_Link=https://www.snapeda.com/parts/DW01A/Fortune+Semiconductor/view-part/?ref=snap
U12: "Complete single cell Li-Ion battery with a constant current / constant voltage linear charger", Package=Package, Availability="Not in stock", Check_prices=https://www.snapeda.com/parts/TP4056/NanJing+Top+Power+ASIC+Corp./view-part/?ref=eda, MF="NanJing Top Power ASIC Corp.", MP=TP4056, PRICE=None, SnapEDA_Link=https://www.snapeda.com/parts/TP4056/NanJing+Top+Power+ASIC+Corp./view-part/?ref=snap
UP3: library part AMS1117-x.x, "x.x Volt, 800mA Low-Dropout Linear Regulator, 4-pin SOT-223", Data=16-12-2016, Designer="Ali Hafizi"
Y3: library part XTAL, "XTAL Crystal", ComponentLink1Description=Datasheet, ComponentLink2Description=Reference, Design Date=2017-1-3, Designer="ABBAS BASEREH", Mounting Technology="Surface Mount\Through-Hole", Status=Unreleased
JP1 JP2: Company=E.P.I.L, Defualt State=Close, Design Date=2011/11/02

## Via types
v1: diameter 0.5, hole 0.3, Top Layer to Bottom Layer, tented both sides, 48 vias
v2: diameter 1.27, hole 0.711, Top Layer to Bottom Layer, tented both sides, 28 vias
v3: diameter 1, hole 0.5, Top Layer to Bottom Layer, tented both sides, 16 vias
v4: diameter 1.27, hole 0.7, Top Layer to Bottom Layer, tented both sides, 15 vias

## Nets (pads, with @x,y where several pads share a name; then routed paths per layer and width w, separated by ;. In a path a pad name is that pad's centre, name@x,y a point inside that pad or via, vN(x,y) a via of type N, cw(c..) or ccw(c..) an arc to the next point about the centre after c; other vN are vias at no path point)
3.3v: C50.1 C51.1 C55.1 C60.2 C61.1 C62.1 C66.1 C67.1 C68.1 C69.1 IC11.5 IC11.6 JP1.1 JP2.2 NRF2.2 P4.1 R45.2 R50.2 R54.1 R55.1 R56.1 R57.1 R61.2 R62.2 S1.2 SHT1.1 U10.7-8 | length 237.6
  Top Layer w0.254: v4(56.134,38.354) 62.23,32.258 ; v4(57.912,26.543) 62.23,30.861 62.23,32.258 ; v4(65.405,20.955) 65.405,29.083 62.23,32.258
  Top Layer w0.7: C61.1 15.621,24.511 25.019,33.909 33.274,33.909 34.29,34.925 34.29,38.263 ; JP2.2 34.29,38.263 ; P4.1 34.29,38.263
  Bottom Layer w0.2: R56.1@42.799,10.922 46.609,10.922 50.8,15.113 50.8,15.768 49.591,16.977 49.571,16.977 49.022,17.526 48.768,17.526 R45.2
  Bottom Layer w0.254: JP1.1 29.845,8.382 30.988,7.239 30.988,4.826 30.226,4.064 30.226,3.048 S1.2 ; IC11.6 54.106,24.63 54.657,24.079 55.194,24.079 55.323,24.208 ; IC11.5 55.229,24.208 55.323,24.208 ; v4(57.912,26.543) 58.039,26.543 58.213,26.369 58.213,26.134 58.241,26.106 58.241,25.621 C50.1 56.831,24.21 C51.1 56.707,24.319 56.261,24.765 55.88,24.765 55.323,24.208 ; R55.1 R54.1 65.405,23.194 v4(65.405,20.955)
  Bottom Layer w0.4: C66.1 8.45,26.611 8.399,26.56 ; R62.2 9.191,18.415 ; U10.7-8 8.399,26.56 ; C61.1 14.196,19.784 12.827,18.415 ; R50.2 38.481,13.843 37.846,13.208 17.018,13.208 ; R56.1 42.799,9.906 43.405,9.3 SHT1.1 ; R56.1@42.799,10.922 30.607,10.922 29.845,10.16 JP1.1 28.321,8.636 28.067,8.89 25.146,8.89 23.495,7.239 17.78,7.239 17.018,8.001 17.018,13.208 ; P4.1 54.411,39.497 54.976,39.497 C55.1 ; 8.399,26.56 8.048,26.209 C67.1 C69.1 C68.1 2.54,23.448 R61.2 2.206,21.289 5.08,18.415 9.191,18.415 ; 9.191,18.415 12.827,18.415 ; 12.827,18.415 12.827,14.097 13.716,13.208 17.018,13.208
  Bottom Layer w0.7: C61.1 15.858,20.021 22.688,20.021 C62.1 23.104,20.193 24.247,21.336 C60.2 26.948,21.36 26.948,24.36 NRF2.2
"3.3v / 12v": 
"3.3v Keys": 
"5v B1205": 
+5: C73.1 C74.1 C76.1 D22.1 D24.1 JP2.1 Q5.2 R64.2 R69.2 UP3.2 | length 44
  Top Layer w0.4: v3(23.495,35.687) v3(25.781,35.687)
  Bottom Layer w0.4: D22.1 20.066,36.322 20.701,35.687 v3(23.495,35.687) ; JP2.1 Q5.2 37.724,43.138 R69.2
  Bottom Layer w1: UP3.2 JP2.1 ; D24.1 D22.1 20.066,42.037 21.084,43.055 21.084,45.244 C73.1
+12v: ADC1.1 ADC2.1 D24.2 J5.1 UP3.3 | length 123.2
  Bottom Layer w0.7: D24.2 2.54,39.497 0.762,37.719 0.762,21.082 12.544,9.3 ADC1.1 ; J5.1@17.51,55.214 17.51,57.42 14.224,60.706 14.224,62.357 15.113,63.246 49.784,63.246 52.268,60.762 ADC2.1
  Bottom Layer w1: D24.2 11.938,39.751 11.938,43.039 ; UP3.3 11.938,43.039 ; J5.1@16.26,55.214 14.447,55.214 11.938,52.705 11.938,43.039
"+12v Adopter": 
+12v_Sun_LED: 
ADC1: IC11.12 R58.2 | length 5
  Bottom Layer w0.254: R58.2 50.038,21.082 50.419,21.082 51.899,22.562 51.917,22.562 IC11.12
ADC2: IC11.13 R59.2 | length 3.5
  Bottom Layer w0.254: R59.2 48.006,21.336 48.71,21.336 IC11.13
ADC3: C56.1 R48.1 R66.2 R67.1 | length 13
  Bottom Layer w0.254: R67.1 38.053,19.732 40.259,17.526 41.674,17.526 C56.1 42.48,18.096 R48.1
ADC4: IC11.15 R49.2 | length 5.4
  Bottom Layer w0.254: R49.2 45.466,23.368 46.228,23.368 47.295,22.301 48.275,22.301 IC11.15
Bat+: J4.1 JP1.2 R52.2 SW1.3 | length 118.5
  Top Layer w0.254: JP1.2 38.1,8.636 40.386,10.922 56.642,10.922 62.611,16.891 64.77,16.891 67.183,19.304 67.183,30.353 66.421,31.115 v4(66.421,33.147) ; J4.1 35.072,55.011 35.687,55.626 42.926,55.626 44.831,57.531 52.959,57.531 54.864,55.626 v4(54.864,55.372)
  Bottom Layer w0.254: JP1.2 34.069,8.636 35.005,7.7 R52.2 ; v4(54.864,55.372) 60.96,49.276 66.421,49.276 67.31,48.387 67.31,35.687 66.421,34.798 v4(66.421,33.147)
  Bottom Layer w0.7: SW1.3 33.909,56.388 34.986,55.311 34.986,53.807 J4.1
Bat-: C71.2 C72.2 J4.2 Q7.2 Q7.3 U11.6 | length 23.5
  Bottom Layer w0.4: J4.2 40.005,53.721 43.053,50.673 ; Q7.3 42.007,49.627 42.657,50.277 ; Q7.2 42.657,50.277 ; C71.2 47.197,50.626 47.244,50.673 ; U11.6 49.215,50.607 49.149,50.673 ; C72.2 52.752,50.673 49.149,50.673 ; 42.657,50.277 43.053,50.673 ; 43.053,50.673 47.244,50.673 ; 47.244,50.673 49.149,50.673
Blink: IC11.46 R53.2 | length 41.2
  Bottom Layer w0.254: R53.2 56.504,3.937 57.785,5.218 57.785,12.065 63.881,18.161 63.881,20.955 64.22,21.294 64.22,26.077 63.627,26.67 60.602,26.67 57.173,30.099 56.073,30.099 IC11.46
"CE - NRF": IC11.23 NRF2.3 | length 18
  Bottom Layer w0.254: NRF2.3 31.242,26.924 33.02,25.146 45.444,25.146 IC11.23
"Charge En": IC11.31 R74.1 | length 10.9
  Bottom Layer w0.254: R74.1 45.397,33.321 IC11.31
"CO2 IN 1": ADC1.3 C58.1 R56.2 R58.1 | length 34.9
  Bottom Layer w0.254: ADC1.3 20.177,8.017 20.326,7.868 23.108,7.868 27.432,12.192 42.545,12.192 42.799,12.446 R56.2 45.165,13.542 45.993,14.37 45.993,16.928 C58.1 46.021,17.065 R58.1
"CO2 IN 2": ADC2.3 C59.1 R57.2 R59.1 | length 60.6
  Top Layer w0.254: v3(40.64,15.367) 40.64,24.003 54.991,38.354 54.991,51.943 52.959,53.975 49.367,53.975 47.768,55.574 ADC2.3
  Bottom Layer w0.254: R57.2 40.64,15.113 v3@40.868,15.341 ; v3(40.64,15.367) 40.842,15.367 41.096,15.621 42.781,15.621 C59.1 45.085,17.925 45.085,18.415 R59.1
Cooler: 
"Cooler out": 
"CSN - NRF": IC11.24 NRF2.4 | length 21
  Bottom Layer w0.254: NRF2.4 28.194,28.194 30.618,28.194 33.158,25.654 45.27,25.654 IC11.24
"CSN - W25": 
D4: 
D5: 
D6: 
D7: 
"Day lamp": 
"Day lamp out": 
"Down button": 
"Down button K": 
E: 
"ESP 3.3v": 
fuse: 
"Gas heater": 
"Gas heater out": 
GND: ADC1.4 ADC2.4 C50.2 C51.2 C52.2 C53.2 C54.2 C55.2 C56.2 C57.2 C58.2 C59.2 C60.1 C61.2 C62.2 C63.2 C64.2 C65.2 C66.2 C67.2 C68.2 C69.2 C70.2 C73.2 C74.2 C75.2 C76.2 IC11.7 J5.2 NRF2.1 P4.4 Q1.2 Q6.2 Q7.6 Q7.7 R46.1 R51.1 R63.1 R65.2 R67.2 R73.1 R75.2 R76.2 SHT1.4 U10.4 U10.6 U10.10 U10.15 U12.1 U12.3 U12.9 UP3.1 | length 541.4
  Top Layer w0.254: v3(33.401,1.397) v3(35.814,1.397) ; v3(39.624,21.336) v3(39.624,19.558) 39.624,18.796 v4(38.481,17.653) 39.497,16.637 39.497,14.478 39.773,14.202 39.983,14.202 40.005,14.224 44.248,14.224 ; v3(44.704,14.478) 44.502,14.478 44.248,14.224 ; v3(48.26,14.224) 44.248,14.224
  Top Layer w0.4: 2.54,31.496 v4(3.683,31.496) ; v4(19.05,30.353) 19.05,45.75 C73.2 ; ADC1.4@22.677,9.3 22.677,6.406 22.733,6.35 v4(22.733,5.969) ; ADC1.4@22.769,9.391 C62.2@22.769,17.562 ; C76.2 31.242,48.883 ; v4(31.242,43.053) 31.242,48.883 ; ADC2.4@42.198,58.434 ADC2.4@55.338,58.434 ; v4(45.593,43.053) 45.466,42.926 43.307,42.926 ; v4(46.355,39.878) 43.307,42.926 ; SHT1.4@52.268,9.3 55.245,9.3 ; v1(54.991,20.193) v1(52.451,17.653) 50.966,16.168 50.966,15.836 v1(51.689,15.113) 54.083,12.719 54.591,12.719 v1(54.61,12.7) 56.007,12.7 v1(57.785,14.478) v1(59.817,16.51) 62.357,19.05 62.357,21.463 v4(59.835,23.985) 59.779,23.929 58.6,23.929 57.023,22.352 v3(56.896,22.352) ; SHT1.4@55.338,6.59 55.338,9.207 55.245,9.3 ; v4(63.627,15.494) 62.103,15.494 55.909,9.3 55.245,9.3 ; 31.242,48.883 37.35,48.883 43.307,42.926
  Top Layer w1: C61.2 4.036,16.284 2.54,17.78 2.54,31.496 2.54,38.227 15.24,38.227 16.764,39.751 16.764,47.006 17.653,47.895 C73.2
  Bottom Layer w0.2: U10.6 10.165,25.81 10.448,25.527 ; 11.049,25.654 11.176,25.781 11.557,25.781 11.903,25.435 12.149,25.435 12.274,25.31 U10.15
  Bottom Layer w0.254: C67.2 6.604,29.95 6.753,30.099 10.668,30.099 11.049,29.718 11.049,28.947 U10.10 11.049,25.654 10.922,25.527 10.448,25.527 10.299,25.378 U10.4 10.299,24.142 9.906,23.749 9.42,23.749 9.271,23.6 9.271,22.432 C70.2 ; v4@22.733,6.59 v4(22.733,5.969) 22.733,3.048 24.384,1.397 v3(33.401,1.397) ; 29.146,18.605 31.131,18.605 R51.1 ; v3(35.814,1.397) 43.307,1.397 44.008,2.098 Q1.2 ; v3(39.624,19.558) 39.751,19.685 40.64,19.685 41.112,19.213 C56.2 ; v3(39.624,21.336) 39.624,22.203 39.773,22.352 40.655,22.352 C57.2 ; v3(44.704,14.478) 44.824,14.598 44.824,15.43 C59.2 ; C58.2 47.991,14.986 48.26,14.986 ; v3(48.26,14.224) 48.26,14.986 ; C52.2 48.499,14.986 48.26,14.986 ; v1(51.689,15.113) 51.689,14.859 53.969,12.579 56.128,12.579 61.849,18.299 61.849,21.68 60.325,23.204 60.325,23.495 ; v3@57.08,22.225 56.458,22.225 C51.2 55.061,23.622 54.396,23.622 53.747,24.271 IC11.7 50.927,27.073 50.927,32.766 51.74,33.579 54.94,33.579 55.644,32.875 P4.4
  Bottom Layer w0.4: v4(3.683,31.496) 3.556,31.496 2.54,30.48 C68.2 C69.2 C67.2 ; R63.1 7.112,20.494 7.112,21.483 7.346,21.717 7.874,21.717 7.984,21.827 8.666,21.827 C70.2 ; C66.2 C66.2 11.049,28.947 12.036,28.947 C65.2 ; ADC1.4@12.607,6.59 22.733,6.59 ADC1.4@25.747,6.59 ; C63.2 C64.2 v4(19.05,30.353) ; C62.2@22.769,17.562 C62.2 ; 26.924,17.653 26.924,15.24 28.067,14.097 34.925,14.097 v4(38.481,17.653) ; C60.1 31.623,21.336 32.719,22.432 R67.2 ; v4(31.242,43.053) R65.2 31.289,40.64 33.929,40.64 34.163,40.406 R75.2 Q6.2 ; Q7.6 32.409,49.627 ; Q7.7 33.059,50.277 32.409,49.627 ; SHT1.4@42.198,6.59 SHT1.4@55.338,6.59 ; R73.1 44.497,53.768 45.212,54.483 45.212,55.668 45.268,55.724 45.268,57.912 44.746,58.434 42.198,58.434 39.799,60.833 34.036,60.833 32.639,59.436 32.639,56.769 28.434,52.564 C76.2 28.813,48.883 29.557,49.627 32.409,49.627 ; R76.2 45.894,43.053 48.895,43.053 49.403,42.545 U12.1 52.959,42.545 53.213,42.799 U12.9 52.578,45.085 U12.3 ; v4(46.355,39.878) 48.387,39.878 48.768,40.259 57.15,40.259 59.182,38.227 ; C54.2 57.821,16.419 58.42,17.018 ; P4.4 58.783,32.875 59.436,33.528 59.436,35.037 C55.2 59.182,37.789 59.182,38.227 ; C53.2 59.019,17.617 58.42,17.018 ; C50.2 59.338,24.475 59.828,23.985 v4(59.835,23.985) ; 59.442,15.996 58.42,17.018 ; v4@59.831,23.989 60.325,23.495 ; v4(63.627,15.494) 67.31,19.177 67.31,30.099 65.358,32.051 ; R46.1 65.358,32.051 ; 59.182,38.227 65.358,32.051
  Bottom Layer w0.7: C61.2 19.205,16.284 20.574,17.653 C62.2 26.924,17.653 28.194,17.653 29.146,18.605 29.671,19.13 C60.1 ; C60.1@29.464,21.543 NRF2.1
  Bottom Layer w1: J5.2@17.01,61.214 18.01,61.214 20.32,61.214 21.59,59.944 21.59,54.356 19.685,52.451 16.129,52.451 14.884,51.206 UP3.1 26.974,47.639 28.218,48.883 C76.2
  other v1: 52.578,43.561 53.975,43.561 52.578,44.577 53.975,44.577 52.578,45.593 53.975,45.593
  other v2: 16.241,4.378 20.241,4.378 24.241,4.378 20.241,16.378 24.241,16.378 36.241,16.378 52.241,28.378 20.241,32.378 56.241,32.378 64.241,32.378 4.241,36.378 44.241,36.378 48.241,36.378 60.241,36.378 64.241,36.378 32.241,48.378 16.241,52.378 20.241,52.378 24.241,52.378 32.241,52.378 24.241,56.378 20.241,60.378 24.241,60.378 28.241,60.378
GND-3.3v: 
GND-12v: 
GND_Sun_LED: 
Heater: 
"Heater out": 
Humidity: 
"Humidity out": 
input1: 
input2: 
input3: 
input4: 
input5: 
input6: 
input7: 
"IRQ - NRF": IC11.28 NRF2.8 | length 22.5
  Bottom Layer w0.254: NRF2.8 28.575,33.655 30.999,33.655 33.666,30.988 45.611,30.988 IC11.28
N220: 
NetC7_1: 
NetC18_1: 
NetC34_1: 
NetC40_1: 
NetC41_1: 
NetC41_2: 
NetC42_1: 
NetC53_1: C53.1 IC11.8 Y3.1 | length 8.9
  Bottom Layer w0.254: IC11.8 56.072,21.209 57.68,21.209 Y3.1 60.136,18.752 C53.1
NetC54_1: C54.1 R47.1 Y3.2 | length 4.3
  Bottom Layer w0.254: R47.1 54.514,17.684 54.514,17.473 Y3.2 56.7,15.287 C54.1
NetC57_1: C57.1 R49.1 R50.1 R51.2 | length 20.2
  Bottom Layer w0.254: R50.1 29.591,15.494 32.385,15.494 32.639,15.748 32.639,20.574 33.147,21.082 37.973,21.082 38.575,20.48 42.47,20.48 C57.1 42.607,20.509 R49.1
NetC63_1: C63.1 C64.1 C65.1 D22.2 D23.2 R60.2 U10.12-13 | length 32.9
  Bottom Layer w0.4: U10.12-13 14.334,26.56 14.859,26.035 23.749,26.035 24.511,26.797 24.511,39.442 D22.2 ; C65.1 13.736,28.829 14.605,28.829 14.859,28.575 R60.2
  Bottom Layer w1: D23.2 24.066,42.172 24.066,39.997 D22.2
NetC70_1: C70.1 U10.3 | length 3.5
  Bottom Layer w0.254: U10.3 10.799,22.602 11.049,22.352 C70.1
NetC71_1: C71.1 R68.2 U11.5 | length 12.9
  Bottom Layer w0.4: C71.1 44.45,49.356 44.45,48.226 44.684,47.992 47.984,47.992 48.351,47.625 50.038,47.625 ; U11.5 50.165,47.752 50.038,47.625 ; R68.2 52.959,48.848 52.959,47.879 52.705,47.625 50.038,47.625
NetC72_1: C72.1 Q4.2 R66.1 R68.1 SW1.2 U12.5 | length 90.7
  Top Layer w0.7: v3(26.67,40.005) 26.67,40.64 25.527,41.783 25.527,48.572 31.369,54.414 SW1.2
  Bottom Layer w0.4: Q4.2 27.244,37.609 27.813,37.04 27.813,34.671 26.797,33.655 25.908,33.655 25.4,33.147 25.4,26.416 26.045,25.771 29.942,25.771 29.952,25.781 31.496,25.781 32.661,24.616 35.455,24.616 36.068,24.003 R66.1
  Bottom Layer w0.7: v3(26.67,40.005) 26.67,38.783 27.244,38.209 Q4.2 ; SW1.2 31.541,58.338 31.541,60.116 33.274,61.849 49.149,61.849 50.927,60.071 50.927,56.915 50.915,56.903 50.915,54.27 51.337,53.848 54.737,53.848 55.88,52.705 55.88,46.405 55.83,46.355 U12.5
  other v3: 26.67,38.989
NetC75_1: C75.1 LD1.2 LD2.2 Q5.3 U12.4 U12.8 | length 49.5
  Bottom Layer w0.4: Q5.3 44.069,47.389 ; U12.4 50.053,46.355 49.957,46.451 49.957,46.359 49.953,46.355 49.53,46.355 49.022,45.847 48.053,45.847 C75.1 48.006,47.117 47.734,47.389 44.069,47.389 ; U12.8 55.688,41.086 55.753,41.021 ; LD1.2 LD2.2 66.124,40.724 65.659,40.259 62.484,40.259 61.722,41.021 55.753,41.021 ; 44.069,47.389 44.196,47.262 44.196,41.91 45.085,41.021 55.753,41.021
NetCR1_3: 
NetD1_1: 
NetD2_1: 
NetD3_1: 
NetD4_1: 
NetD5_1: 
NetD6_1: 
NetD7_1: 
NetD8_1: 
NetD11_2: 
NetD12_1: 
NetD17_2: 
NetD19_1: 
NetD21_1: D21.1 R52.1 | length 2.6
  Bottom Layer w0.254: D21.1 37.465,3.556 37.973,4.064 37.973,4.873 R52.1
NetD21_2: D21.2 Q1.3 | length 5.2
  Bottom Layer w0.254: D21.2 41.783,2.667 42.164,3.048 Q1.3
NetD23_1: D23.1 Q4.3 | length 2.7
  Bottom Layer w1: D23.1 28.194,42.545 Q4.3
NetDZ1_1: 
NetIC1_1: 
NetIC2_1: 
NetIC3_1: 
NetIC4_1: 
NetIC5_1: 
NetIC6_1: 
NetIC7_1: 
NetIC7_4: 
NetIC8_1: 
NetIC9_1: 
NetIC9_2: 
NetIC11_9: IC11.9 R47.2 | length 5.4
  Bottom Layer w0.254: IC11.9 55.753,20.846 55.753,20.054 R47.2
NetIC11_14: IC11.14 R48.2 | length 4.3
  Bottom Layer w0.254: R48.2 46.562,22.178 46.772,22.178 47.106,21.844 48.536,21.844 IC11.14
NetL2_1: L2.1 U10.11
  other v1: 11.684,26.416 11.684,27.051 14.732,32.512 14.732,33.147 14.732,33.782 14.732,34.417
NetL2_2: L2.2 U10.9
  other v1: 10.414,26.416 10.414,27.051 7.366,32.512 7.366,33.147 7.366,33.782 7.366,34.417
NetLD1_1: LD1.1 R71.2 | length 3.4
  Bottom Layer w0.4: R71.2 63.373,45.466 63.627,45.72 63.627,46.447 LD1.1
NetLD2_1: LD2.1 R72.2 | length 3.6
  Bottom Layer w0.4: R72.2 63.246,43.307 63.5,43.053 63.5,42.002 LD2.1
NetMOC1_1: 
NetMOC1_6: 
NetMos1_1: 
NetQ1_1: Q1.1 R53.1 | length 2.4
  Bottom Layer w0.254: Q1.1 49.008,3.998 R53.1
NetQ4_1: Q4.1 R64.1 R65.1 | length 4.3
  Bottom Layer w1: R64.1 29.154,35.823 29.154,37.955 Q4.1 29.18,37.928 31.207,37.928 R65.1
NetQ5_1: Q5.1 R70.2 | length 3.1
  Bottom Layer w0.4: Q5.1 40.64,45.339 41.101,45.8 R70.2
NetQ6_1: Q6.1 R74.2 R75.1 | length 6.5
  Bottom Layer w0.4: R75.1 35.988,35.48 36.595,36.087 38.288,36.087 Q6.1
NetQ6_3: Q6.3 R69.1 R70.1 | length 7.5
  Bottom Layer w0.4: Q6.3 39.925,40.56 40.339,40.974 R69.1 42.498,43.053 R70.1
NetQ7_1: Q7.1 Q7.8 | length 5.8
  Bottom Layer w0.4: Q7.8 Q7.1
NetQ7_4: Q7.4 U11.1 | length 10.7
  Top Layer w0.254: v3(42.799,48.895) 44.831,48.895 v3(49.022,53.086)
  Bottom Layer w0.254: Q7.4 41.094,48.904 41.909,48.904 41.918,48.895 v3(42.799,48.895) ; U11.1 v3@49.215,52.893
NetQ7_5: Q7.5 U11.3 | length 21.9
  Top Layer w0.254: v3(39.116,49.149) 40.259,48.006 47.752,48.006 v3(52.451,52.705)
  Bottom Layer w0.254: Q7.5 37.928,48.977 38.1,49.149 v3(39.116,49.149) ; U11.3 51.115,52.683 51.264,52.832 52.324,52.832 v3(52.451,52.705)
NetR7_1: 
NetR8_1: 
NetR19_1: 
NetR25_2: 
NetR33_1: 
NetR60_1: R60.1 U10.1 U10.14 | length 6.3
  Bottom Layer w0.2: U10.1 11.799,24.396 11.938,24.257 13.335,24.257 ; U10.14 13.052,25.81 13.335,25.527 13.335,24.257 ; R60.1 14.859,23.338 14.234,23.963 14.184,23.963 13.89,24.257 13.335,24.257
NetR61_1: R61.1 R63.2 U10.5 | length 6.4
  Bottom Layer w0.254: R61.1 6.938,23.114 R63.2 6.985,24.257 8.038,25.31 U10.5
NetR62_1: R62.1 U10.2 | length 7.5
  Bottom Layer w0.254: U10.2 11.299,24.134 11.684,23.749 12.954,23.749 13.335,23.368 13.335,20.469 13.186,20.32 R62.1
NetR71_1: R71.1 U12.6 | length 2.9
  Bottom Layer w0.4: U12.6 55.788,45.185 56.996,45.185 57.277,45.466 R71.1
NetR72_1: R72.1 U12.7 | length 3
  Bottom Layer w0.4: U12.7 55.788,43.715 56.869,43.715 57.022,43.562 57.277,43.307 R72.1
NetR73_2: R73.2 U11.2 | length 6.4
  Bottom Layer w0.4: R73.2 47.197,53.293 48.133,54.229 49.403,54.229 50.165,53.467 U11.2
NetR76_1: R76.1 U12.2 | length 6.4
  Bottom Layer w0.4: R76.1 45.847,44.704 46.101,44.45 48.895,44.45 49.53,43.815 U12.2
NetRL1_12: 
NetRL2_12: 
NetSp1_1: 
NetSp1_2: 
"Night lamp": 
"Night lamp out": 
NRST: C52.1 IC11.10 P4.5 R45.1 | length 24.9
  Top Layer w0.254: v4(51.308,20.066) 51.308,24.638 57.749,31.079 P4.5
  Bottom Layer w0.254: C52.1 50.581,17.098 R45.1 v4(51.308,20.066) ; v4@51.362,20.012 53.467,22.116 53.467,22.413 IC11.10
OSC32_IN: 
OSC32_OUT: 
OSC_IN: 
OSC_OUT: 
output1: 
output2: 
output3: 
output4: 
output5: 
output6: 
output7: 
P220: 
PAM8403: 
"PAM8403 STM32": 
RS: 
RW: 
"RXD ESP32": 
"RXD GSM": 
SCL: IC11.47 R55.2 SHT1.3 | length 35.8
  Bottom Layer w0.254: SHT1.3 49.768,11.033 50.292,11.557 56.515,11.557 63.246,18.288 63.246,21.082 63.763,21.599 63.763,25.251 63.614,25.4 61.225,25.4 56.983,29.642 56.334,29.642 IC11.47
SCL_ADC_PIR: 
SDA: IC11.48 R54.2 SHT1.2 | length 34.8
  Bottom Layer w0.254: SHT1.2 47.768,11.192 48.641,12.065 56.261,12.065 62.658,18.462 R54.2 61.468,23.241 60.96,23.749 60.96,25.019 56.947,29.032 56.425,29.032 55.866,28.474 IC11.48
"Setting button 1": 
"Setting button 1 K": 
"Setting button 2": 
"Setting button 2 K": 
"SPI2 MISO": IC11.26 NRF2.7 | length 18.2
  Bottom Layer w0.254: NRF2.7 31.115,32.004 33.147,29.972 45.19,29.972 IC11.26
"SPI2 MOSI": IC11.27 NRF2.6 | length 24
  Bottom Layer w0.254: NRF2.6 28.194,30.734 28.194,32.512 28.88,33.198 30.81,33.198 33.528,30.48 45.4,30.48 IC11.27
"SPI2 SCK": IC11.25 NRF2.5 | length 17
  Bottom Layer w0.254: NRF2.5 45.016,29.464 IC11.25
"Status botton": IC11.45 R46.2 S1.1 | length 67
  Bottom Layer w0.254: S1.1 34.544,1.27 35.306,0.508 53.721,0.508 58.293,5.08 58.293,11.811 66.78,20.298 66.78,26.438 66.548,26.67 64.389,26.67 64.008,27.051 64.008,27.686 63.754,27.94 R46.2 60.071,27.94 57.404,30.607 55.862,30.607 IC11.45
Sun: 
"Sun 12v LED": 
"Sun out": 
SWCLK: IC11.36 P4.3 | length 9.3
  Bottom Layer w0.254: IC11.36 49.885,32.371 49.24,33.016 49.24,33.227 50.049,34.036 56.134,34.036 P4.3
SWDIO: IC11.35 P4.2 | length 9.3
  Bottom Layer w0.254: IC11.35 48.641,32.915 48.641,33.274 49.911,34.544 53.05,34.544 P4.2
"Tab 3.3 stm32": 
"Tab 5v": M7.S UP3.4
  other v2: 4.241,44.378 4.241,48.378 8.241,48.378 8.241,52.378
"Timer 1": 
"Timer 1 out": 
"Timer 2": 
"Timer 2 out": 
"TXD ESP32": 
"TXD GSM": 
"UART4 RX - ESP32": 
"UART4 TX - ESP32": 
"Up button": 
"Up button K": 
"USART1 RX - GSM": 
"USART1 TX - GSM": 
VBAT: 
VEE: 
"Voltage detect": 
pads on no net: ADC1.2 ADC2.2 IC11.1 IC11.2 IC11.3 IC11.4 IC11.11 IC11.16 IC11.17 IC11.18 IC11.19 IC11.20 IC11.21 IC11.22 IC11.29 IC11.30 IC11.32 IC11.33 IC11.34 IC11.37 IC11.38 IC11.39 IC11.40 IC11.41 IC11.42 IC11.43 IC11.44 J5.3 M6.S M8.S M9.S S1.3 S1.4 SW1.1 SW1.4 U11.4
copper on no net:
  other v1: 4.953,9.557 62.992,9.557 3.539,10.143 6.367,10.143 61.578,10.143 64.406,10.143 2.953,11.557 6.953,11.557 60.992,11.557 64.992,11.557 3.539,12.971 6.367,12.971 61.578,12.971 64.406,12.971 4.953,13.557 62.992,13.557 62.992,51.594 61.578,52.18 64.406,52.18 60.992,53.594 64.992,53.594 61.578,55.008 64.406,55.008 62.992,55.594

## Polygon pours and split planes (outlines as drawn)
GND on Top Layer "GND_L01_P000" (solid, remove dead copper, pour order 0): 8.509,65.024 59.436,65.024 59.436,56.515 67.945,56.515 67.945,8.509 59.436,8.509 59.436,0 8.509,0 8.509,8.509 0,8.509 0,56.515 8.509,56.515
GND on Bottom Layer "GND_L02_P002" (solid, remove dead copper, pour order 2): 8.509,65.024 59.436,65.024 59.436,56.515 67.945,56.515 67.945,8.509 59.436,8.509 59.436,0 8.509,0 8.509,8.509 0,8.509 0,56.515 8.509,56.515

## Keep-outs
Keep-Out Layer:
  the board outline again, w0.254

## Other copper
Top Layer:
  region net NetC72_1: 26.289,40.513 26.289,38.735 ccw(c26.461,38.806) 26.39,38.634 26.554,38.634 ccw(c26.726,39.049) 26.898,38.634 ccw(c26.726,38.922) 27.051,38.84 27.051,40.513
  region net "Tab 5v": 10.414,41.275 0.889,41.275 0.889,55.626 10.414,55.626
  region net NetL2_2: 10.668,26.035 10.16,26.035 10.16,28.194 6.858,31.496 6.858,35.052 9.144,35.052 9.144,30.861 10.668,29.337
  region net NetL2_1: 11.43,26.035 11.938,26.035 11.938,28.194 15.24,31.496 15.24,35.052 12.954,35.052 12.954,30.861 11.43,29.337
  pour cut-out: 50.228,16.065 53.975,12.319 56.261,12.319 62.738,18.796 62.738,21.844 60.071,24.511 58.674,24.511
Bottom Layer:
  region net NetC72_1: 26.289,40.513 26.289,38.735 ccw(c26.596,38.735) 26.379,38.518 26.58,38.317 ccw(c26.797,38.534) 26.797,38.227 ccw(c26.184,38.84) 27.051,38.84 27.051,40.513
  region net "Tab 5v": 10.414,41.275 0.889,41.275 0.889,55.626 10.414,55.626
  region net GND: 61.087,22.442 61.849,21.68 60.997,21.68 60.96,21.717
  region net GND: 56.515,13.843 56.896,13.462 56.896,13.208 56.758,13.208 56.128,12.579 53.969,12.579 53.34,13.208
  region net GND: 11.938,25.908 10.16,25.908 10.16,25.561 10.321,25.4 11.938,25.4

## Silkscreen, mask and mechanical layers (free items; w line width, h text height)
Top Overlay:
  lines w0.2: 25.018,64.643 28.956,64.643 ; 29.337,69.469 29.337,69.723 ; 29.718,69.469 29.718,69.723 ; 30.099,69.469 30.099,69.723 ; 30.607,69.469 30.607,69.723 ; 30.988,69.469 30.988,69.723 ; 31.369,69.469 31.369,69.723 ; 32.639,64.643 28.956,64.643 ; 37.719,64.643 31.877,64.643 31.877,69.723 28.956,69.723 28.956,64.643
  text "3v3" at 54.596,39.202 h1.7 r45
  text "DIO" at 57.263,36.789 h1.7 r45
  text "CLK" at 58.28,35.518 h1.7 r45
  text "G" at 60.057,33.741 h1.7 r45
  text "R" at 61.976,31.949 h1.7 r45
Bottom Overlay:
  lines w0.2: 9.271,28.067 9.271,27.813 13.335,27.813 ; 10.541,19.304 10.541,18.415 ; 12.827,27.813 12.827,28.067 ; 13.335,27.559 13.335,27.813 ; 26.67,37.719 25.781,37.211 24.638,37.211 24.638,35.179 ; 64.643,22.225 64.643,20.447 ; 10.541,18.415 12.573,18.415 12.573,14.478 8.636,14.478 8.636,18.415 10.541,18.415 ; 13.335,13.716 16.764,13.716 16.764,11.557 8.382,11.557 8.382,13.716 13.335,13.716 ; 13.335,13.716 13.335,27.813 ; 24.638,35.179 25.273,35.179 25.273,32.893 22.352,32.893 22.352,35.179 24.638,35.179 ; 64.643,20.447 66.802,20.447 66.802,14.732 62.611,14.732 62.611,20.447 64.643,20.447
Top Solder:
  region: 10.414,41.275 0.889,41.275 0.889,55.626 10.414,55.626
Bottom Solder:
  region: 10.414,41.275 0.889,41.275 0.889,55.626 10.414,55.626

## Dimensions
8.509,65.024 to 8.509,0 on Mechanical 1
0,56.515 to 67.945,56.515 on Mechanical 1

## Text inside footprints (layer, text, board x,y; h text height)
C62: Top Overlay "+" at 23.7,20.513 h1 r270
C73: Top Overlay "+" at 20.355,45.035 h1 r90
IC11: Mechanical 13 "*" at 57.912,27.686 h1.27 r315; Mechanical 13 "*" at 57.912,27.686 h1.27 r315; Bottom Overlay "*" at 57.912,27.686 h1.27 r315; Bottom Overlay "*" at 57.912,27.686 h1.27 r315
J4: Top Overlay "1" at 34.832,55.118 h1; Mechanical 14 "1" at 34.832,55.118 h1
SW1: Top Overlay "1" at 24.969,59.666 h1; Mechanical 8 "1" at 24.969,59.666 h1